# Altium PCB iMX6 Rex Development Baseboard V1I1_PCB.PcbDoc (part 4 of 6)
Units mm, origin at the board's own origin, x right, y up, seen from the top; angles counter-clockwise.
Board outline 135 x 110 mm, 6 copper layers (L1, L2, L3, L4 (PWR), L5, L6), stack 1.542 mm thick; 580 components, 458 nets, 2100 pads, 1201 vias.
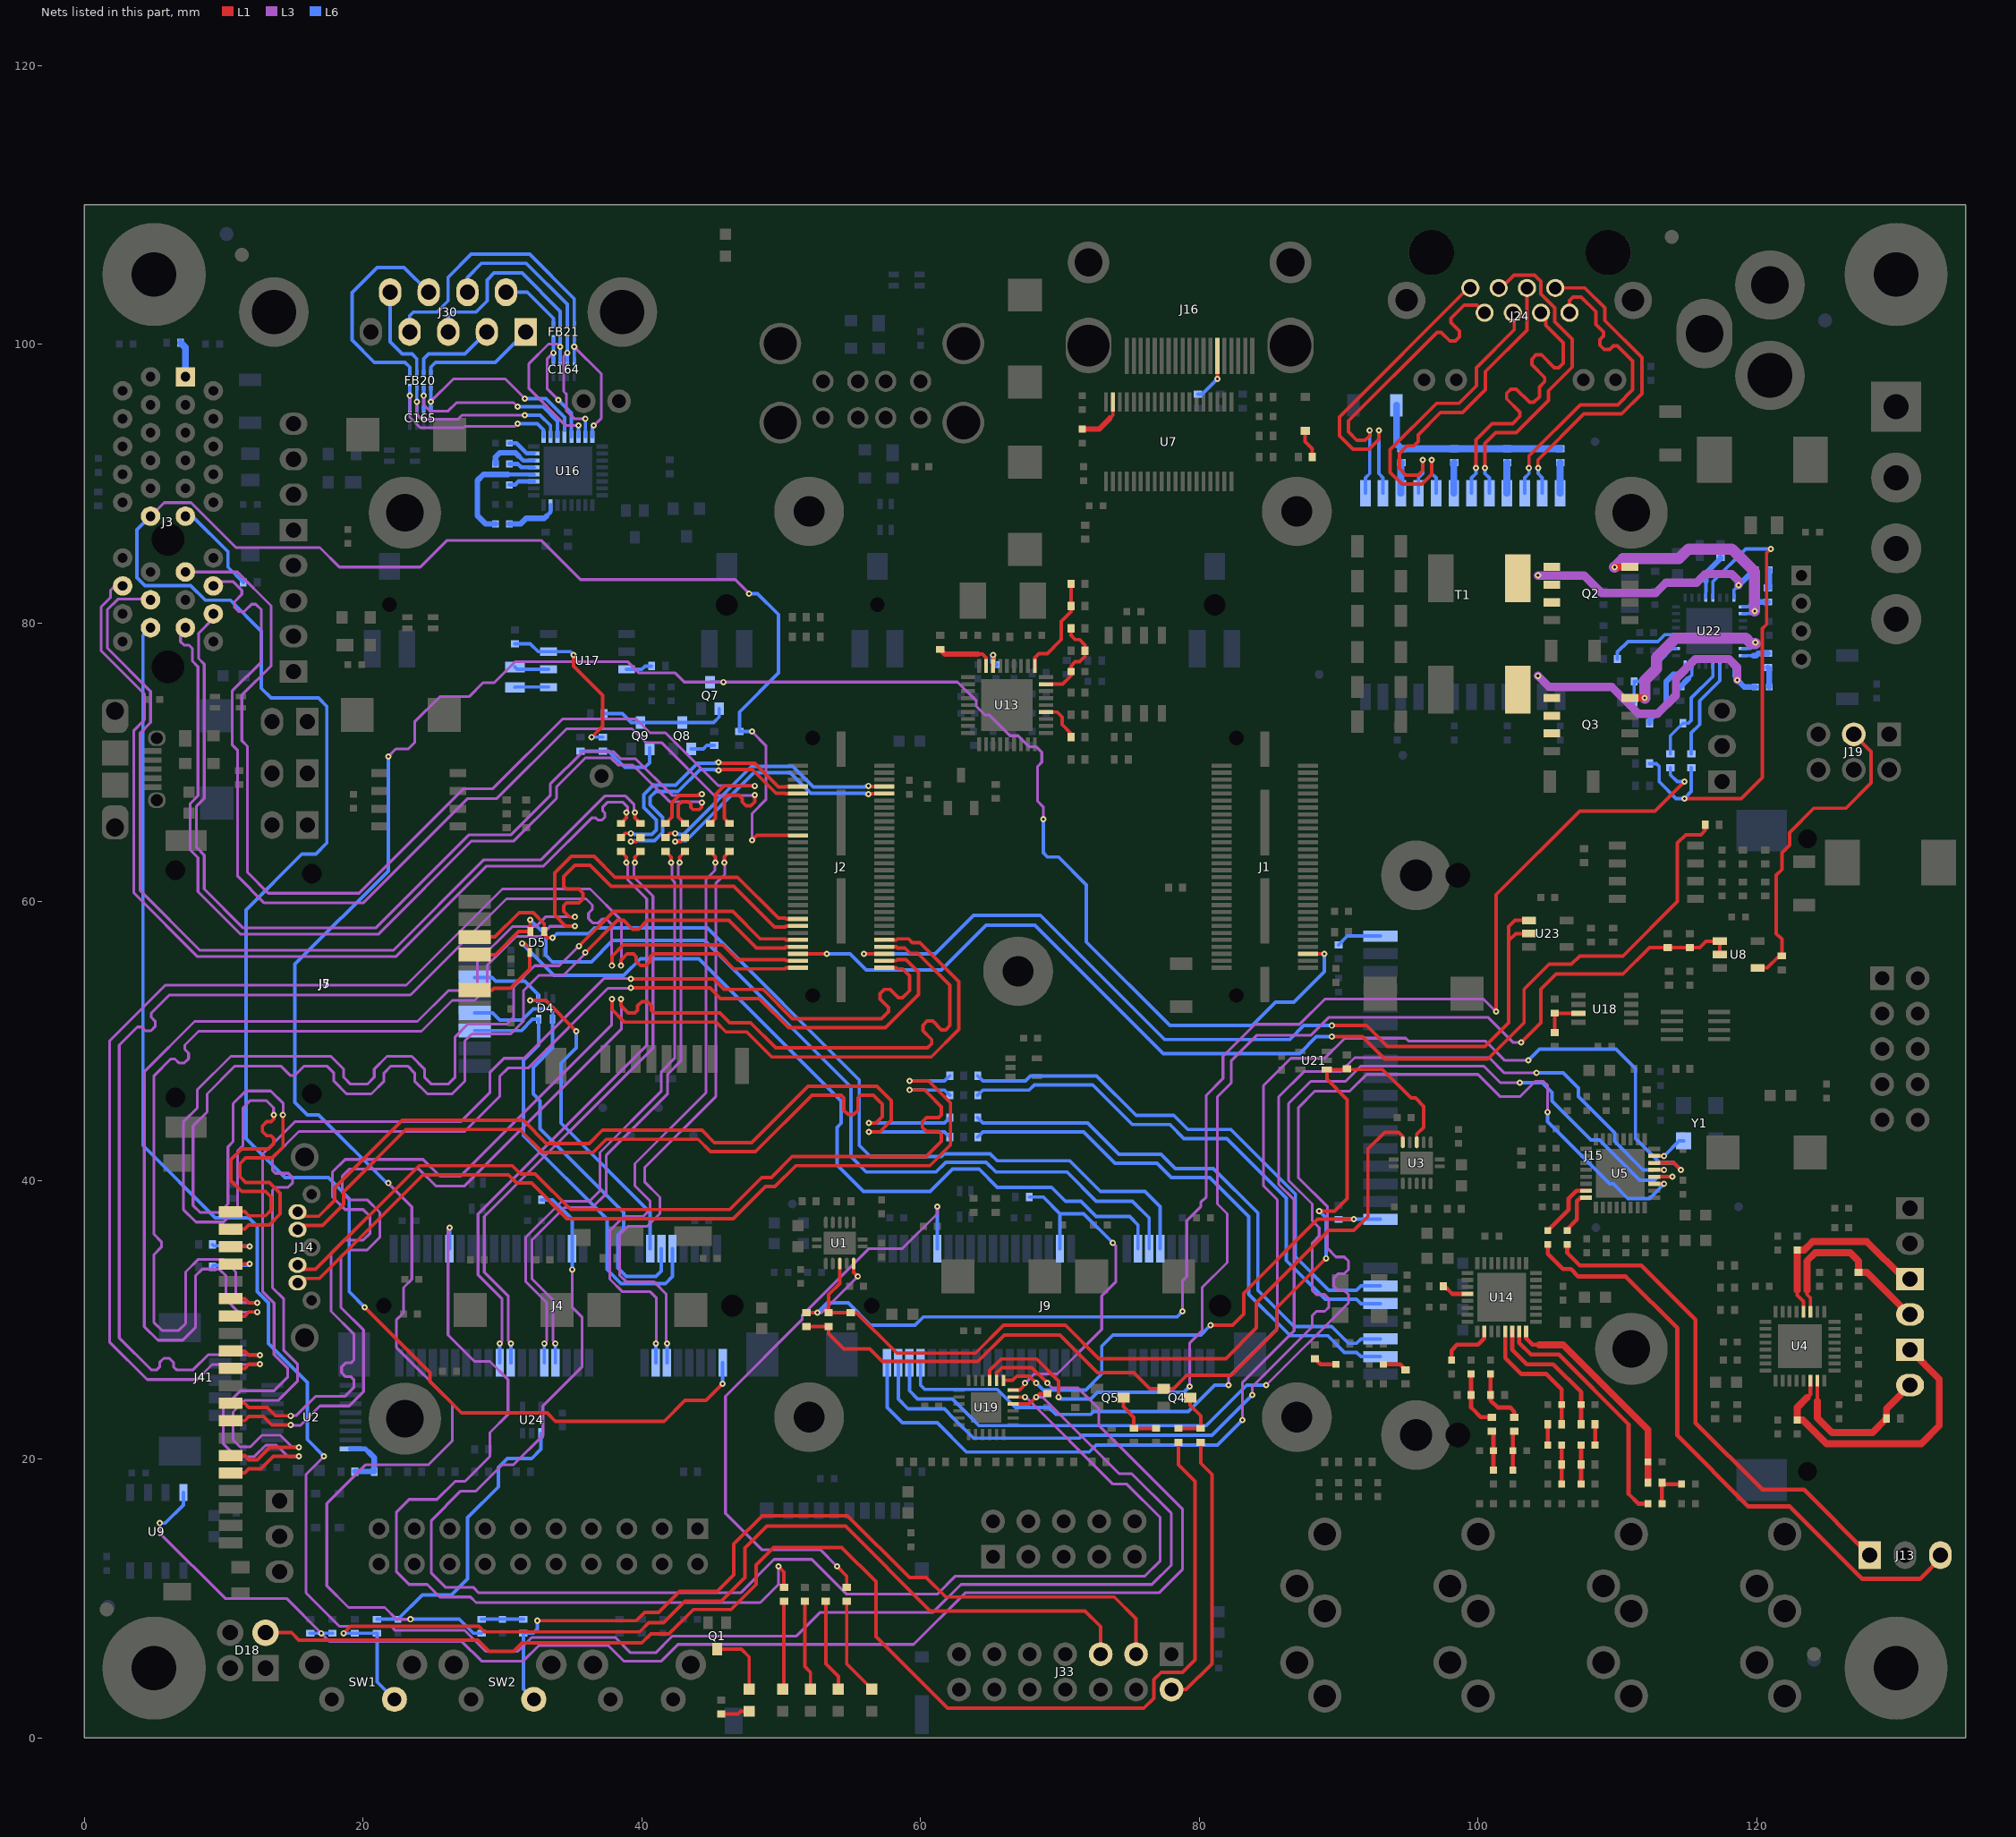
[diagram p8: the nets of this part, all layers, seen from the top]

## Via types
v1: diameter 0.45, hole 0.2, L1 to L6, tented both sides, 1092 vias
v2: diameter 1, hole 0.5, L1 to L6, tented both sides, 109 vias

## Nets (pads, with @x,y where several pads share a name; then routed paths per layer and width w, separated by ;. In a path a pad name is that pad's centre, name@x,y a point inside that pad or via, vN(x,y) a via of type N, cw(c..) or ccw(c..) an arc to the next point about the centre after c; other vN are vias at no path point) (continued)
LED_MPCIE1_WWAN: J4.42 R19.1 | length 65.4
  L1 w0.25: v1(49.8,12.3) 50.2,11.9 R19.1@50.2,10.8
  L3 w0.2: v1(26.2,36.6) 26.1,36.5 26.1,28.9 28,27 29.1,27 30.4,25.7 30.4,23.2 29.1,21.9 29.1,20.193 27.307,18.4 26.6,18.4 25.3,17.1 23.3,17.1 22.4,16.2 22.4,11.9 23.3,11 24.6,11 25.5,10.1 27.7,10.1 28.1,9.7 48.5,9.7 49.8,11 v1(49.8,12.3)
  L6 w0.25: J4.42@26.2,35.1 v1(26.2,36.6)
LED_MPCIE2_WWAN: J9.42 R25.1 | length 44.1
  L1 w0.25: v1(54,12.3) 54.7,11.6 R25.1@54.7,10.8
  L3 w0.2: v1(54,12.3) 52.8,13.5 48.6,13.5 46,16.1 46,24.5 51.5,30 51.5,30.3 56.3,35.1 58.7,35.1 61.2,37.6 v1(61.2,38.1)
  L6 w0.25: J9.42@61.2,35.1 v1(61.2,38.1)
LGATE1_5V: Q2.4 U22.18 | length 16.1
  L1 w0.5: v1(109.8,84) Q2.4@110.895,84
  L3 w0.8: v1(109.8,84) 110.4,84.6 114.4,84.6 115.1,85.3 118.2,85.3 119.85,83.65 v1(119.85,80.85)
  L6 w0.23: U22.18@119,80.65 119.65,80.65 v1(119.85,80.85)
LGATE2_3V3: Q3.4 U22.23 | length 13.3
  L1 w0.5: Q3.4@110.9,74.605 v1@111.965,74.605
  L3 w0.8: v1(111.965,74.61) 111.965,75.869 112.8,76.704 112.8,77.5 114.2,78.9 119.204,78.9 119.579,78.525 v1@119.9,78.525
  L6 w0.23: U22.23@119,78.15 119.55,78.15 119.9,78.5 v1(119.9,78.6)
LINE_IN_C_L: C59.2 J13.3 | length 43.9
  L1 w0.3: C59.2@105,35.4 105,34.725 106.1,33.625 106.675,33.625 107.2,33.1 110.6,33.1 114.3,29.4 114.3,21.7 119.4,16.6 122.376,16.6 127.576,11.4 131.7,11.4 133.18,12.88 J13.3@133.18,13.1
LINE_IN_C_R: C60.2 J13.1 | length 35.6
  L1 w0.3: C60.2@106.4,35.4 106.4,34.8 107.3,33.9 111.7,33.9 115.6,30 115.6,22.6 120.4,17.8 123.4,17.8 J13.1@128.1,13.1
LINE_IN_L: C59.1 U5.15 | length 4.4
  L1 w0.3: C59.1@105,36.4 106.5,37.9 106.5,38.7 107.05,39.25 U5.15@107.75,39.25
LINE_IN_R: C60.1 U5.16 | length 3.1
  L1 w0.3: C60.1@106.4,36.4 106.4,36.5 107.1,37.2 107.1,38.5 107.35,38.75 U5.16@107.75,38.75
LINEIN_L: C133.1 R95.1 U14.14 | length 9.8
  L1 w0.3: U14.14@102.45,29.15 102.45,27.85 103.5,26.8 105.4,26.8 107.4,24.8 C133.1@107.4,23.9 R95.1@107.4,22.5
LINEIN_R: C132.1 R94.1 U14.13 | length 9.4
  L1 w0.3: U14.13@101.95,29.15 101.95,27.25 103.1,26.1 104.9,26.1 106,25 R94.1@106,22.5
"LOCAL_PWR / NON_REM0": R78.2 R82.2 U13.28 | length 7.3
  L1 w0.25: U13.28@68.2,76.9 68.2,77.493 68.4,77.693 68.4,77.7 68.5,77.8 69.1,77.8 70.1,78.8 70.1,80.107 70.8,80.807 R82.2@70.8,81.2 R78.2@70.8,82.8
LVDS0_CABC: J2.6 U23.1 U23.2 | length 64.5
  L1 w0.25: v1(55.93,56.25) J2.6@57.39,56.25 ; v1(89.5,51.1) 92,51.1 93.5,49.6 100.5,49.6 102.2,51.3 102.2,57.2 ; U23.2@103.65,57.7 102.7,57.7 102.2,57.2 ; U23.1@103.65,58.65 102.65,58.65 102.2,58.2 102.2,57.2
  L6 w0.25: v1(55.93,56.25) 61.05,56.25 63.8,59 68.6,59 77.5,50.1 86.5,50.1 87.5,51.1 v1(89.5,51.1)
LVDS0_CLK_N: J2.13 J41.14 | length 96.5
  L1 w0.25: J41.14@10.5,30.25 11.5,30.25 11.8,30.55 v1(12.4,30.55) ; v1(35.2,58.9) 34.8,58.9 34.4,59.3 34.4,59.7 34.6,59.9 35.475,59.9 35.775,60.2 35.775,60.6 35.475,60.9 34.6,60.9 34.4,61.1 34.4,61.8 35.2,62.6 36.3,62.6 37.8,61.1 46.6,61.1 49.525,58.175 50.275,58.175 50.35,58.25 J2.13@51.21,58.25
  L3 w0.2: v1(12.4,30.55) 12.375,30.525 11.075,30.525 10.165,31.435 10.165,33.135 9.665,33.635 8.465,33.635 7.965,33.135 7.965,29.435 7.055,28.525 5.275,28.525 4.3,29.5 4.3,47.79 7.91,51.4 23.9,51.4 26.11,53.61 27.72,53.61 28.2,54.09 28.2,55.7 30.7,58.2 32.4,58.2 33.125,58.925 35.175,58.925 v1(35.2,58.9)
LVDS0_CLK_P: J2.15 J41.15 | length 96.5
  L1 w0.25: J41.15@10.5,31.5 11.5,31.5 11.8,31.2 v1(12.4,31.2) ; v1(35.2,58.25) 34.531,58.25 33.75,59.031 33.75,62.069 34.931,63.25 36.569,63.25 38.069,61.75 46.869,61.75 49.794,58.825 50.275,58.825 50.35,58.75 J2.15@51.21,58.75
  L3 w0.2: v1(12.4,31.2) 12.375,31.225 11.365,31.225 ; v1(35.2,58.25) 35.175,58.225 33.415,58.225 32.69,57.5 30.99,57.5 28.9,55.41 28.9,53.8 28.01,52.91 26.4,52.91 24.19,50.7 8.2,50.7 7.2,49.7 7.2,49.4 7.475,49.125 7.475,48.725 7.175,48.425 6.775,48.425 6.5,48.7 6.2,48.7 5,47.5 5,36.125 5.525,35.6 5.525,35.2 5,34.675 5,29.79 5.565,29.225 6.765,29.225 7.265,29.725 7.265,33.425 8.175,34.335 9.955,34.335 10.865,33.425 10.865,31.725 ; 10.865,31.725 11.365,31.225 ; 10.865,31.725 11.365,31.225
LVDS0_DPS: J41.18 R52.1 R54.2 | length 4.1
  L1 w0.25: J41.18@10.5,35.25 v1(11.85,35.25)
  L6 w0.25: R52.1@9.2,35.4 9.3,35.3 R54.2@10.7,35.3 11.8,35.3 v1(11.85,35.25)
LVDS0_FRC: J41.17 R53.1 R55.2 | length 4.1
  L1 w0.25: J41.17@10.5,34 v1(11.85,34)
  L6 w0.25: R53.1@9.2,33.8 9.3,33.9 R55.2@10.7,33.9 11.75,33.9 v1(11.85,34)
LVDS0_PWM: J2.5 R58.2 | length 82.9
  L1 w0.25: J2.5@51.21,56.25 v1(53.27,56.25) ; v1(89.5,50.3) 91.7,50.3 93.3,48.7 100.7,48.7 103.3,51.3 103.3,53.7 105.1,55.5 106.7,55.5 107.3,56.1 110.4,56.1 114.3,60 114.3,64.2 114.9,64.8 116,64.8 116.3,65.1 R58.2@116.3,65.5
  L6 w0.25: v1(53.27,56.25) 54.95,56.25 56.1,55.1 61.5,55.1 64.7,58.3 68.2,58.3 77.4,49.1 87.2,49.1 88.4,50.3 v1(89.5,50.3)
LVDS0_TX0_N: J2.2 J41.5 | length 96.5
  L1 w0.25: J41.5@10.5,19 11.5,19 11.8,19.3 12.669,19.3 13.569,20.2 v1(15.4,20.2) ; v1(39.2,54.45) 45.15,54.45 45.9,53.7 48.7,53.7 50.8,51.6 57.2,51.6 57.7,52.1 57.7,52.4 57.1,53 57.1,53.4 57.4,53.7 57.8,53.7 58.4,53.1 58.7,53.1 59.2,53.6 59.2,54.665 58.69,55.175 58.325,55.175 58.25,55.25 J2.2@57.39,55.25
  L3 w0.2: v1(15.4,20.2) 15.375,20.175 14.61,20.175 13.785,21 13.015,21 12.19,20.175 10.885,20.175 9.975,21.085 9.975,23.665 11.21,24.9 13.61,24.9 14.6,25.89 14.6,26.51 13.61,27.5 13.61,31.19 12.8,32 12.8,41.9 15.1,44.2 27,44.2 29.105,46.305 29.105,47.75 30.11,48.755 31.555,48.755 37.275,54.475 39.175,54.475 v1(39.2,54.45)
LVDS0_TX0_P: J2.4 J41.6 | length 96.5
  L1 w0.25: J41.6@10.5,20.25 11.5,20.25 11.8,19.95 12.4,19.95 13.3,20.85 v1(15.4,20.85) ; v1(39.2,53.8) 44.881,53.8 45.631,53.05 48.431,53.05 50.531,50.95 57.469,50.95 59.85,53.331 59.85,54.934 58.959,55.825 58.325,55.825 58.25,55.75 J2.4@57.39,55.75
  L3 w0.2: v1(15.4,20.85) 15.375,20.875 14.9,20.875 14.075,21.7 12.725,21.7 11.9,20.875 11.175,20.875 10.675,21.375 10.675,23.375 11.5,24.2 13.9,24.2 15.3,25.6 15.3,26.8 14.31,27.79 14.31,31.48 13.5,32.29 13.5,39.3 13.7,39.5 14.625,39.5 14.93,39.805 14.93,40.205 14.635,40.5 13.71,40.5 13.505,40.705 13.505,41.615 15.39,43.5 27.29,43.5 29.805,46.015 29.805,47.46 30.4,48.055 31.845,48.055 37.565,53.775 39.175,53.775 v1(39.2,53.8)
LVDS0_TX1_N: J2.8 J41.8 | length 96.4
  L1 w0.25: J41.8@10.5,22.75 11.5,22.75 11.8,23.05 12.85,23.05 13.45,22.45 v1(14.8,22.45) ; v1(38.5,53) 38.5,52.519 39.019,52 39.5,52 39.7,52.2 39.7,52.525 40,52.825 40.4,52.825 40.7,52.525 40.7,52.2 40.9,52 45.6,52 46.3,51.3 47.8,51.3 49.6,49.5 60.5,49.5 60.8,49.8 60.8,50.1 60.175,50.725 60.175,51.125 60.475,51.425 60.875,51.425 61.5,50.8 61.8,50.8 62.1,51.1 62.1,54 59.8,56.3 59.25,56.3 58.875,56.675 58.325,56.675 58.25,56.75 J2.8@57.39,56.75
  L3 w0.2: v1(14.8,22.45) 14.825,22.425 15.515,22.425 16.9,23.81 19.01,23.81 20.03,24.83 20.03,29.26 18.4,30.89 18.4,34.5 18.9,35 20.29,35 21.2,35.91 21.2,37.69 20.29,38.6 19,38.6 18.5,39.1 18.5,40.3 19,40.8 24.01,40.8 25.21,39.6 27.29,39.6 38.525,50.835 38.525,52.975 v1(38.5,53)
LVDS0_TX1_P: J2.10 J41.9 | length 96.4
  L1 w0.25: J41.9@10.5,24 11.5,24 11.8,23.7 13.119,23.7 13.719,23.1 v1(14.8,23.1) ; v1(37.85,53) 37.85,52.25 38.75,51.35 45.331,51.35 46.031,50.65 47.531,50.65 49.331,48.85 60.769,48.85 62.75,50.831 62.75,54.269 59.957,57.063 59.407,57.063 59.144,57.325 58.325,57.325 58.25,57.25 J2.10@57.39,57.25
  L3 w0.2: v1(14.8,23.1) 14.825,23.125 15.225,23.125 16.61,24.51 18.72,24.51 19.33,25.12 19.33,25.7 19.13,25.9 18.755,25.9 18.455,26.2 18.455,26.6 18.755,26.9 19.13,26.9 19.33,27.1 19.33,28.97 17.7,30.6 17.7,34.79 18.61,35.7 20,35.7 20.5,36.2 20.5,37.4 20,37.9 18.71,37.9 17.8,38.81 17.8,40.59 18.71,41.5 24.3,41.5 25.5,40.3 27,40.3 37.825,51.125 37.825,52.975 v1(37.85,53)
LVDS0_TX2_N: J2.1 J41.11 | length 96.5
  L1 w0.25: J41.11@10.5,26.5 11.5,26.5 11.8,26.8 v1(12.6,26.8) ; v1(38.5,55.4) 38.5,55.8 38.94,56.24 39.4,56.24 39.6,56.04 39.6,55.715 39.9,55.415 40.3,55.415 40.6,55.715 40.6,56.04 40.8,56.24 45.54,56.24 46.606,55.175 50.275,55.175 50.35,55.25 J2.1@51.21,55.25
  L3 w0.2: v1(12.6,26.8) 12.575,26.775 9.165,26.775 8.09,25.7 4.51,25.7 1.8,28.41 1.8,49.99 5.81,54 23.1,54 30,60.9 36.29,60.9 38.525,58.665 38.525,55.425 v1(38.5,55.4)
LVDS0_TX2_P: J2.3 J41.12 | length 96.4
  L1 w0.25: J41.12@10.5,27.75 11.5,27.75 11.8,27.45 v1(12.6,27.45) ; v1(37.85,55.4) 37.85,56.069 38.671,56.89 45.81,56.89 46.875,55.825 50.275,55.825 50.35,55.75 J2.3@51.21,55.75
  L3 w0.2: v1(12.6,27.45) 12.575,27.475 8.875,27.475 7.8,26.4 6.6,26.4 6.4,26.6 6.4,26.925 6.1,27.225 5.7,27.225 5.4,26.925 5.4,26.6 5.2,26.4 4.8,26.4 2.5,28.7 2.5,49.7 3.8,51 4.1,51 4.375,50.725 4.775,50.725 5.075,51.025 5.075,51.425 4.8,51.7 4.8,52 6.1,53.3 23.39,53.3 30.29,60.2 36,60.2 36.45,59.75 36.45,59.45 36.175,59.175 36.175,58.775 36.475,58.475 36.875,58.475 37.15,58.75 37.45,58.75 37.825,58.375 37.825,55.425 v1(37.85,55.4)
LVDS0_TX3_N: J2.7 J41.19 | length 96.4
  L1 w0.25: J41.19@10.5,36.5 11.5,36.5 11.8,36.8 13.269,36.8 14.05,37.581 14.05,39.069 13.269,39.85 11.569,39.85 11.169,40.25 11.169,41.2 11.569,41.6 13.469,41.6 14.25,42.381 v1(14.25,44.7) ; v1(35.95,56.35) 38.25,58.65 38.7,58.65 39.325,58.025 39.775,58.025 40.4,58.65 46.25,58.65 48.225,56.675 50.275,56.675 50.35,56.75 J2.7@51.21,56.75
  L3 w0.2: v1(14.25,44.7) 14.275,44.725 14.275,45.5 13.365,46.41 11.585,46.41 10.675,45.5 10.675,42.775 10.3,42.4 10.3,38.3 9.7,37.7 8.3,37.7 7.8,38.2 7.8,43.9 8.805,44.905 8.805,46.205 10.8,48.2 14.1,48.2 14.775,47.525 15.1,47.525 15.775,48.2 17.4,48.2 17.9,47.7 17.9,47.11 18.81,46.2 20.59,46.2 21.5,47.11 21.5,47.7 22,48.2 23.2,48.2 23.7,47.7 23.7,47.11 24.61,46.2 26.39,46.2 27.3,47.11 27.3,50 27.805,50.505 30.595,50.505 31.51,51.42 31.51,53.61 32.6,54.7 34.365,54.7 35.95,56.285 v1(35.95,56.35)
LVDS0_TX3_P: J2.9 J41.20 | length 96.4
  L1 w0.25: J41.20@10.5,37.75 11.5,37.75 11.8,37.45 13,37.45 13.4,37.85 13.4,38.8 13,39.2 11.3,39.2 10.519,39.981 10.519,41.469 11.3,42.25 13.2,42.25 13.6,42.65 13.6,43 13.4,43.2 13.075,43.2 12.775,43.5 12.775,43.9 13.075,44.2 13.4,44.2 13.6,44.4 v1(13.6,44.7) ; v1(35.49,56.81) 37.981,59.3 46.519,59.3 48.494,57.325 50.275,57.325 50.35,57.25 J2.9@51.21,57.25
  L3 w0.2: 13.575,45.2 13.575,44.725 v1(13.6,44.7) ; 13.575,45.21 13.075,45.71 11.875,45.71 11.375,45.21 11.375,42.485 11,42.11 11,38.01 9.99,37 8.01,37 7.1,37.91 7.1,44.19 8.105,45.195 8.105,46.495 10.51,48.9 17.69,48.9 18.6,47.99 18.6,47.4 19.1,46.9 20.3,46.9 20.8,47.4 20.8,47.99 21.71,48.9 23.49,48.9 24.4,47.99 24.4,47.4 24.9,46.9 26.1,46.9 26.6,47.4 26.6,50.29 27.515,51.205 30.305,51.205 30.81,51.71 30.81,53.9 32.31,55.4 34.075,55.4 v1@35.488,56.812
LVDS_BLON: R165.1 R166.2 U8.1 U8.2 U19.15 | length 85.3
  L1 w0.24: U19.15@64.95,25.65 64.95,26.2
  L1 w0.25: 64.95,26.2 64.95,26.35 65.783,27.183 68.317,27.183 69.9,25.6 v1(69.9,24.45) ; v1(103.1,49.9) 104.5,51.3 104.5,53.7 105.6,54.8 110.4,54.8 112.3,56.7 R165.1@115.2,56.7 115.9,56.7 116.35,57.15 U8.1@117.35,57.15 U8.2@117.35,56.2
  L3 w0.2: v1(79.3,25.2) 79.3,28.3 80.2,29.2 80.2,32.3 82,34.1 82,37.6 81.3,38.3 81.3,46 82.3,47 82.3,48.6 84.1,50.4 88,50.4 89.3,51.7 100.7,51.7 102.5,49.9 v1(103.1,49.9)
  L6 w0.25: v1(69.9,24.45) 70.05,24.3 72.2,24.3 72.7,24.8 78.9,24.8 v1(79.3,25.2)
LVDS_EN: R167.1 R168.2 U9.4 U19.14 | length 109.6
  L1 w0.24: U19.14@65.45,25.65 65.45,26.175
  L1 w0.25: 65.45,26.175 65.842,26.567 67.983,26.567 v1(69.1,25.45)
  L3 w0.2: v1(5.4,15.4) 5.4,14.7 10.1,10 14.5,10 v1(17,7.5) 17.6,6.9 27.1,6.9 28.5,5.5 31.5,5.5 32.62,6.62 37.58,6.62 38.7,5.5 41.4,5.5 42.6,6.7 59.5,6.7 63.2,10.4 77.1,10.4 78.8,12.1 78.8,16.4 72.8,22.4 72.8,23.6 71.3,25.1 69.45,25.1 v1(69.1,25.45)
  L6 w0.25: v1(5.4,15.4) 5.8,15.4 7.105,16.705 U9.4@7.105,17.6 ; R168.2@16.2,7.5 v1(17,7.5) R167.1@17.8,7.5
MCT0: R87.1 T1.15 | length 2.2
  L6 w0.5: T1.15@94.455,89.302 94.455,91.455 R87.1@94.5,91.5
MCT1: R85.1 T1.21 | length 2.2
  L6 w0.5: T1.21@102.075,89.302 102.075,91.475 R85.1@102.1,91.5
MCT2: R86.1 T1.18 | length 2.2
  L6 w0.5: T1.18@98.265,89.302 98.265,91.465 R86.1@98.3,91.5
MCT3: R84.1 T1.24 | length 2.2
  L6 w0.5: T1.24@105.885,89.302 105.885,91.485 R84.1@105.9,91.5
MCT_CHASSIS: C119.1 R84.2 R85.2 R86.2 R87.2 | length 14.6
  L6 w0.5: C119.1@94.15,95.6 94.15,92.85 R87.2@94.5,92.5 R86.2@98.3,92.5 R85.2@102.1,92.5 R84.2@105.9,92.5
MIC_BIAS: C147.1 R102.2 U14.16 | length 15.8
  L1 w0.3: U14.16@103.45,29.15 103.45,28.65 103.9,28.2 104.4,28.2
  L1 w0.5: 104.4,28.2 106.1,28.2 112.2,22.1 C147.1@112.2,19.8 R102.2@112.2,18.3
MIC_IN: C148.1 U14.15 | length 17.8
  L1 w0.3: U14.15@102.95,29.15 102.95,28.35 103.8,27.5 105.8,27.5 110.8,22.5 110.8,17.5 111.5,16.8 C148.1@112.2,16.8
MODEM_LOUT+: C210.2 J10.1 U4.6 | length 21
  L1 w0.28: 123.6,24.4 123.85,24.65 U4.6@123.85,25.625
  L1 w0.5: 123.6,24.4 122.9,23.7 C210.2@122.9,22.8 123.3,22.8 125,21.1 131.8,21.1 133.1,22.4 133.1,25.74 J10.1@131,27.84
MODEM_LOUT-: J10.2 R156.2 U4.7 | length 11.6
  L1 w0.28: 124.35,24.15 U4.7@124.35,25.625
  L1 w0.5: 124.35,24.15 124.35,22.95 125.4,21.9 128.3,21.9 R156.2@129.3,22.9 129.3,23.6 J10.2@131,25.3
MODEM_ROUT+: C212.2 J12.1 U4.20 | length 14
  L1 w0.25: 122.9,32 122.9,31.75 123.35,31.3 U4.20@123.35,30.575
  L1 w0.5: 122.9,32.1 C212.2@122.9,35 123.4,35 124,35.6 127.9,35.6 130.58,32.92 J12.1@131,32.92
MODEM_ROUT-: J12.2 R155.2 U4.19 | length 13.7
  L1 w0.25: 123.6,32.1 123.6,31.8 123.85,31.55 U4.19@123.85,30.575
  L1 w0.5: 123.6,32.1 123.6,34.2 124.2,34.8 126.7,34.8 127.3,34.2 R155.2@127.3,33.4 127.9,33.4 130.92,30.38 J12.2@131,30.38
MPCIE1_CLK1_N: J4.11 R2.2 | length 44.3
  L1 w0.25: v1(45.925,62.8) 45.925,63.225 R2.2@46.3,63.6
  L3 w0.2: v1(41.8,28.3) 41.75,28.35 41.75,31.84 40.89,32.7 38.9,32.7 38.4,33.2 38.4,36.1 39,36.7 40.39,36.7 41.3,37.61 41.3,38.79 40.2,39.89 40.2,40.9 45.3,46 45.3,61.3 45.95,61.95 45.95,62.775 v1(45.925,62.8)
  L6 w0.25: J4.11@41.8,26.9 v1(41.8,28.3)
MPCIE1_CLK1_P: J4.13 R4.2 | length 44.3
  L1 w0.25: R4.2@44.9,63.6 45.275,63.225 v1(45.275,62.8)
  L3 w0.2: v1(41,28.3) 41.05,28.35 41.05,31.55 40.6,32 38.61,32 37.7,32.91 37.7,36.39 38.71,37.4 40.1,37.4 40.6,37.9 40.6,38.5 39.5,39.6 39.5,41.19 44.6,46.29 44.6,61.59 45.25,62.24 45.25,62.775 v1(45.275,62.8)
  L6 w0.25: J4.13@41,26.9 v1(41,28.3)
MPCIE1_RX_N: J4.23 R7.2 | length 43.3
  L1 w0.25: v1(42.7,62.8) 42.7,63.2 R7.2@43.1,63.6
  L3 w0.2: v1(33.8,28.3) 33.625,28.475 33.625,31.411 32.118,32.918 32.118,35.718 34.45,38.05 36.436,38.05 37.45,39.064 37.45,41.814 41.85,46.214 41.85,47.614 42.8,48.564 42.8,61.586 42.625,61.761 42.625,62.725 v1(42.7,62.8)
  L6 w0.25: J4.23@33.8,26.9 v1(33.8,28.3)
MPCIE1_RX_P: J4.25 R9.2 | length 43.3
  L1 w0.25: R9.2@41.7,63.6 42.1,63.2 v1(42.1,62.8)
  L3 w0.2: v1(33,28.3) 33.175,28.475 33.175,31.225 31.668,32.732 31.668,35.905 34.264,38.5 36.25,38.5 37,39.25 37,42 41.4,46.4 41.4,47.8 42.35,48.75 42.35,61.4 42.175,61.575 42.175,62.725 v1(42.1,62.8)
  L6 w0.25: J4.25@33,26.9 v1(33,28.3)
MPCIE1_SIM_CLK: D4.4 J4.12 J5.C3 | length 33.2
  L6 w0.25: J5.C3@28,52.01 29.29,52.01 29.8,51.5 31.4,51.5 32.2,52.3 33.4,52.3 33.6,52.1 D4.4@33.6,51.55 33.6,49.5 32.2,48.1 32.2,46.2 32.7,45.7 32.7,43.7 38.7,37.7 38.7,36.5 38.275,36.075 38.275,33.725 38.9,33.1 41,33.1 41.4,33.5 J4.12@41.4,35.1
MPCIE1_SIM_DATA: D4.5 J4.10 J5.C7 | length 33.1
  L6 w0.25: J5.C7@28,50.74 31.34,50.74 32.15,51.55 D4.5@32.6,51.55 32.6,49.7 31.5,48.6 31.5,43.2 37.5,37.2 37.5,33.6 38.5,32.6 41.7,32.6 42.2,33.1 J4.10@42.2,35.1
MPCIE1_SIM_RST: D4.1 J4.14 J5.C2 | length 29.3
  L1 w0.25: v1(32,52.9) 33.1,52.9 v1(35.3,50.7)
  L6 w0.25: J5.C2@28,54.55 29.263,54.55 29.513,54.3 31.593,54.3 32.562,53.331 D4.1@32.562,53.05 D4.1@32.412,52.9 ; v1(35.3,50.7) 35.3,49.5 34.2,48.4 34.2,44.1 40.6,37.7 J4.14@40.6,35.1 ; D4.1@32.412,52.9 v1(32,52.9) D4.1@32.412,52.9
MPCIE1_TX_N: J4.31 R12.2 | length 43.2
  L1 w0.25: v1(39.5,62.8) 39.5,63.2 R12.2@39.9,63.6
  L3 w0.2: v1(30.6,28.3) 30.425,28.475 30.425,31.675 28.7,33.4 28.7,37.4 40.8,49.5 40.8,60.386 39.45,61.736 ; 39.425,61.761 39.425,62.725 v1(39.5,62.8)
  L6 w0.25: J4.31@30.6,26.9 v1(30.6,28.3)
MPCIE1_TX_P: J4.33 R16.2 | length 43.2
  L1 w0.25: R16.2@38.5,63.6 38.9,63.2 v1(38.9,62.8)
  L3 w0.2: v1(29.8,28.3) 29.975,28.475 29.975,31.489 28.25,33.214 28.25,37.586 40.35,49.686 40.35,60.2 39,61.55 ; v1(38.9,62.8) 38.975,62.725 38.975,61.575
  L6 w0.25: J4.33@29.8,26.9 v1(29.8,28.3)
MPCIE1_WDISN: J4.20 R73.1 U19.11 | length 107.2
  L1 w0.24: U19.11@66.65,24.45 67.2,24.45
  L1 w0.25: 67.2,24.45 v1(67.5,24.45)
  L3 w0.2: v1(35,33.6) 35,30.9 35.7,30.2 35.7,26.6 32.9,23.8 32.9,21.7 30.8,19.6 30,19.6 28.1,17.7 27,17.7 24.9,15.6 24.9,11.8 25.9,10.8 27.9,10.8 28.3,10.4 47.081,10.4 49.481,12.8 52.2,12.8 54.7,10.3 61.2,10.3 62.5,11.6 76.1,11.6 77.2,12.7 77.2,15.8 74.8,18.2 73.807,18.2 67.557,24.45 v1(67.5,24.45)
  L6 w0.25: R73.1@32.8,38.6 33.6,38.6 35,37.2 J4.20@35,35.1 35,33.7 v1(35,33.6)
MPCIE2_12M_CLK: U5.31 Y1.3 | length 2.5
  L1 w0.25: U5.31@112.65,41.75 v1(113.35,41.75)
  L6 w0.25: v1(113.35,41.75) 114.43,42.83 Y1.3@114.75,42.83
MPCIE2_PCM_CLK: J9.45 U5.30 | length 89.8
  L1 w0.25: U5.30@112.65,41.25 114.05,41.25 v1(114.55,40.75)
  L3 w0.2: v1(82.1,25.3) 82.1,25.9 82.3,26.1 82.307,26.1 85.6,29.393 85.6,38.6 84.6,39.6 84.6,46.793 86.557,48.75 88.993,48.75 90.443,50.2 94.8,50.2 95,50 100.527,50 101.927,48.6 v1(103.6,48.6)
  L6 w0.25: J9.45@60,26.9 60,25.3 60.3,25 65.5,25 66.8,23.7 69.2,23.7 69.7,23.2 72.2,23.2 72.4,23.4 79.2,23.4 81.1,25.3 v1(82.1,25.3) ; v1(103.6,48.6) 104.4,49.4 109.9,49.4 111.3,48 111.3,43 113.05,41.25 114.05,41.25 v1(114.55,40.75)
MPCIE2_PCM_RX: J9.47 U5.27 | length 89.7
  L1 w0.25: U5.27@112.65,39.75 v1(113.35,39.75)
  L3 w0.2: v1(84.8,25.3) 90.7,31.2 90.7,31.8 90.4,32.1 89.95,32.1 89.65,32.4 89.65,33 89.95,33.3 90.4,33.3 90.7,33.6 90.7,34.2 90.4,34.5 89.8,34.5 89.2,35.1 89.2,38.1 87.1,40.2 87.1,45.2 88.3,46.4 90.8,46.4 92,47.6 100,47.6 101.6,46 103,46 104.1,47.1 104.7,47.1 105,46.8 v1(105,44.9)
  L6 w0.25: J9.47@59.2,26.9 59.2,24.9 59.8,24.3 62.3,24.3 63.6,23 63.6,22.993 64.193,22.4 73.266,22.4 80.5,22.4 83.4,25.3 v1@84.6,25.3 ; v1(105,44.9) 105,44.2 109.45,39.75 109.7,39.75 110.75,38.7 112.3,38.7 v1(113.35,39.75)
MPCIE2_PCM_SYNC: J9.51 U5.29 | length 89.7
  L1 w0.25: U5.29@112.65,40.75 v1(113.35,40.75)
  L3 w0.2: v1(83.1,22.8) 83.1,25.5 86.8,29.2 86.8,38.6 85.693,39.707 85.693,45.993 87.5,47.8 90.15,47.8 91.15,48.8 100.8,48.8 101.9,47.7 v1(104.2,47.7)
  L6 w0.25: J9.51@57.6,26.9 57.6,23.7 58.7,22.6 61.2,22.6 63.3,20.5 72.1,20.5 72.6,21 81.3,21 v1(83.1,22.8) ; v1(104.2,47.7) 106.107,47.7 107.2,46.607 107.2,46 109.8,43.4 109.8,42.793 111.843,40.75 v1(113.35,40.75)
MPCIE2_PCM_TX: J9.49 U5.28 | length 89.8
  L1 w0.25: U5.28@112.65,40.25 v1(113.95,40.25)
  L3 w0.2: v1(83.8,24.6) 83.8,25.2 88.1,29.5 88.1,30.3 88.4,30.6 89,30.6 89.3,30.9 89.3,31.5 89,31.8 88.4,31.8 88.1,32.1 88.1,35.5 88.6,36 88.6,36.6 88.1,37.1 88.1,38.3 86.4,40 86.4,45.5 88,47.1 90.5,47.1 91.6,48.2 100.4,48.2 101.6,47 v1(103,47)
  L6 w0.25: J9.49@58.4,26.9 58.4,24.3 59.1,23.6 61.707,23.6 62.4,22.907 62.4,22.9 63.8,21.5 71.4,21.5 71.6,21.7 80.9,21.7 v1(83.8,24.6) ; v1(103,47) 104.6,47 105.3,46.3 105.3,45.7 108.1,42.9 108.7,42.9 111.6,40 112.65,40 112.9,40.25 v1(113.95,40.25)
MPCIE2_SIM_CLK: D5.5 J7.C3 J9.12 | length 66.6
  L1 w0.25: J7.C3@28,56.19 29.5,56.19 31.16,57.85 D5.5@32,57.85 v1(32,58.7)
  L6 w0.25: v1(32,58.7) 33.1,57.6 33.1,56.154 33.579,55.675 36.375,55.675 37.9,57.2 44.5,57.2 55,46.7 55,41.7 56.1,40.6 61.1,40.6 61.8,41.3 64.7,41.3 65.4,40.6 70.5,40.6 72.6,38.5 75.2,38.5 76.4,37.3 J9.12@76.4,35.1
MPCIE2_SIM_DATA: D5.4 J7.C7 J9.10 | length 65.7
  L1 w0.25: J7.C7@28,57.46 29.46,57.46 31.2,59.2 32.207,59.2 33,58.407 D5.4@33,57.85 33,57.6 33.2,57.4 v1(33.6,57.4)
  L6 w0.25: v1@33.6,57.3 v1@33.65,57.35 ; v1(33.6,57.4) 33.9,57.7 36.2,57.7 36.6,58.1 44.7,58.1 55.6,47.2 55.6,42.5 56.4,41.7 61.5,41.7 61.7,41.9 65,41.9 65.5,41.4 70.7,41.4 72.9,39.2 76.1,39.2 77.2,38.1 J9.10@77.2,35.1
MPCIE2_SIM_RST: D5.1 J7.C2 J9.14 | length 66.5
  L1 w0.25: J7.C2@28,53.65 29.25,53.65 29.38,53.78 30.58,53.78 31.962,55.162 31.962,56.638 31.6,57 v1(31.4,57)
  L6 w0.25: v1(31.4,57) 33.7,54.7 38.7,54.7 39.9,55.9 44.1,55.9 54.3,45.7 54.3,44.1 54,43.8 54,41.1 55.9,39.2 60.693,39.2 62.293,40.8 64.2,40.8 65.5,39.5 69.4,39.5 70.4,38.5 71.5,38.5 72.6,37.4 75,37.4 75.6,36.8 J9.14@75.6,35.1
MPCIE2_WDISN: J9.20 R150.1 U19.12 | length 24.8
  L1 w0.24: U19.12@66.65,24.95 67.1,24.95 67.5,25.35 v1(67.5,25.45)
  L3 w0.2: v1(67.5,25.45) 68.15,26.1 69.8,26.1 73,29.3 73,31.7 74,32.7 74,35.3 v1(73.8,35.5)
  L6 w0.25: R150.1@67.8,38.8 68.8,38.8 70,37.6 ; J9.20@70,35.1 70,37.6 ; v1(73.8,35.5) 73.8,35.507 71.707,37.6 70,37.6
MX0_N: J24.2 T1.13 | length 23.3
  L1 w0.25: v1(92.225,93.8) 92.225,93.425 92.207,93.407 91.9,93.1 91.3,93.1 90.7,93.7 90.7,94.5 97.05,100.85 97.35,100.85 97.975,100.225 98.375,100.225 98.675,100.525 98.675,100.925 98.05,101.55 98.05,101.85 99,102.8 99.92,102.8 J24.2@100.47,102.25
  L6 w0.25: T1.13@91.915,89.302 91.915,90.399 92.225,90.709 v1(92.225,93.8)
MX0_P: J24.1 T1.14 | length 23.3
  L1 w0.25: v1(92.875,93.8) 92.875,93.156 92.169,92.45 91.031,92.45 90.05,93.431 90.05,94.769 99.25,103.969 J24.1@99.45,103.969
  L6 w0.25: v1(92.875,93.8) 92.875,90.709 93.185,90.399 T1.14@93.185,89.302
MX1_N: J24.6 T1.19 | length 23.3
  L1 w0.25: v1(99.845,91.1) 99.845,93.145 101,94.3 102.481,94.3 103,94.819 103,95.119 102.05,96.069 102.05,96.469 102.35,96.769 102.75,96.769 103.7,95.819 104,95.819 104.4,96.219 104.4,96.919 104.781,97.3 104.781,97.6 103.856,98.525 103.856,98.925 104.156,99.225 104.556,99.225 105.481,98.3 105.781,98.3 106.1,98.619 106.1,100.1 104.85,101.35 104.85,101.92 J24.6@104.52,102.25
  L6 w0.25: T1.19@99.535,89.302 99.535,90.399 99.845,90.709 v1(99.845,91.1)
MX1_P: J24.3 T1.20 | length 23.3
  L1 w0.25: v1(100.495,91.1) 100.495,92.876 101.269,93.65 102.75,93.65 105.05,95.95 105.05,96.65 106.75,98.35 106.75,100.369 105.5,101.619 105.5,102.6 104.5,103.6 104.5,104.5 104.045,104.955 102.585,104.955 101.66,104.03 J24.3@101.48,104.03
  L6 w0.25: v1(100.495,91.1) 100.495,90.709 100.805,90.399 T1.20@100.805,89.302
MX2_N: J24.5 T1.16 | length 23.3
  L1 w0.25: v1(96.035,91.7) 96.035,90.935 95.7,90.6 94.819,90.6 94.35,91.069 94.35,92.15 94.9,92.7 95.4,92.7 95.7,93 95.7,93.5 97.3,95.1 98.9,95.1 100.531,96.731 100.531,98.031 103.51,101.01 J24.5@103.51,104.03
  L6 w0.25: T1.16@95.725,89.302 95.725,90.399 96.035,90.709 v1(96.035,91.7)
MX2_P: J24.4 T1.17 | length 23.3
  L1 w0.25: v1(96.685,91.7) 96.685,90.666 95.969,89.95 94.55,89.95 93.7,90.8 93.7,92.419 97.031,95.75 98.631,95.75 99.881,97 99.881,98.3 102.6,101.019 102.6,102.15 J24.4@102.5,102.25
  L6 w0.25: v1(96.685,91.7) 96.685,90.709 96.995,90.399 T1.17@96.995,89.302
MX3_N: J24.8 T1.22 | length 23.3
  L1 w0.25: v1(103.655,91.1) 103.655,91.974 107.331,95.65 110.031,95.65 111.1,96.719 111.1,98.774 110,99.874 109.7,99.874 109.45,99.624 109.05,99.624 108.75,99.924 108.75,100.324 109,100.574 109,100.874 108.45,101.424 108.45,102.331 107.401,103.38 106.83,103.38 106.56,103.11 J24.8@106.56,102.25
  L6 w0.25: T1.22@103.345,89.302 103.345,90.399 103.655,90.709 v1(103.655,91.1)
MX3_P: J24.7 T1.23 | length 23.3
  L1 w0.25: v1@104.3,91.105 104.3,91.7 107.6,95 110.3,95 111.75,96.45 111.75,99.043 109.1,101.693 109.1,102.6 107.67,104.03 J24.7@105.54,104.03
  L6 w0.25: v1(104.305,91.1) 104.305,90.709 104.615,90.399 T1.23@104.615,89.302
NetC73_1: C73.1 U7.37 | length 3.6
  L1 w0.25: 73.6,94.7 73.8,94.9 U7.37@73.8,95.85
  L1 w0.4: C73.1@71.6,93.9 72.8,93.9 73.6,94.7
NetC120_2: C120.2 R92.2 | length 1.7
  L1 w0.3: R92.2@88.3,27.2 88.7,26.8 C120.2@89.8,26.8
NetC121_2: C121.2 R93.2 | length 1.8
  L1 w0.3: C121.2@93.2,26.8 94.4,26.8 R93.2@94.8,26.4
NetC130_1: C130.1 R94.2 | length 1.5
  L1 w0.3: C130.1@105,21 R94.2@105,22.5
NetC130_2: C130.2 FB14.1 R96.2 | length 2.8
  L1 w0.3: FB14.1@106,18.2 C130.2@106,21
NetC131_1: C131.1 R95.2 | length 1.5
  L1 w0.3: C131.1@108.4,21 R95.2@108.4,22.5
NetC131_2: C131.2 FB15.1 R97.2 | length 2.8
  L1 w0.3: FB15.1@107.4,18.2 C131.2@107.4,21
NetC140_1: C140.1 U14.10 | length 3.9
  L1 w0.3: C140.1@98.1,27.1 98.1,27.8 98.5,28.2 100,28.2 100.45,28.65 U14.10@100.45,29.15
NetC141_2: C141.2 R98.1 R100.2 | length 4.2
  L1 w0.3: C141.2@99.5,26.1 R100.2@99.5,24.6 99.5,23.7 100.2,23 R98.1@101,23
NetC142_2: C142.2 R99.1 R101.2 | length 4.3
  L1 w0.3: C142.2@100.9,26.1 R101.2@100.9,24.6 100.9,24.2 101.4,23.7 102.3,23.7 102.6,23.4 R99.1@102.6,23
NetC143_2: C143.2 FB16.1 R98.2 | length 2.8
  L1 w0.3: R98.2@101,22 101.1,21.9 C143.2@101.1,20.6 FB16.1@101.1,19.2
NetC144_2: C144.2 FB17.1 R99.2 | length 2.8
  L1 w0.3: FB17.1@102.5,19.2 102.5,21.9 R99.2@102.6,22
NetC148_2: C148.2 FB18.1 R102.1 | length 2.9
  L1 w0.3: C148.2@113.2,16.8 R102.1@113.2,18.3 113.3,18.2 FB18.1@114.6,18.2
NetC159_1: C159.1 U16.27 | length 1.9
  L6 w0.3: C159.1@30.5,89.9 30.6,89.9 30.9,89.9 31.15,90.15 U16.27@32.25,90.15
NetC160_1: C160.1 U16.28 | length 8.3
  L6 w0.3: 30.4,90.65 U16.28@32.25,90.65
  L6 w0.4: C160.1@29.5,87.1 28.8,87.1 28.2,87.7 28.2,90.213 28.637,90.65 30.4,90.65
NetC160_2: C160.2 U16.23 | length 3.8
  L6 w0.3: 33.175,87.675 33.45,87.95 U16.23@33.45,88.45
  L6 w0.4: C160.2@30.5,87.1 31.3,87.1 31.7,87.5 33,87.5 33.175,87.675
NetC161_1: C161.1 U16.31 | length 2.1
  L6 w0.3: C161.1@30.5,92.9 31,92.9 31.75,92.15 U16.31@32.25,92.15
NetC162_1: C162.1 U16.29 | length 1.9
  L6 w0.3: C162.1@30.5,91.4 31.1,91.4 31.35,91.15 U16.29@32.25,91.15
NetC162_2: C162.2 U16.30 | length 3.6
  L6 w0.3: 31.136,92 31.486,91.65 U16.30@32.25,91.65
  L6 w0.4: C162.2@29.5,91.4 29.5,91.9 29.8,92.2 30.936,92.2 31.136,92
NetC186_2: C186.2 R127.1 | length 1.3
  L6 w0.4: R127.1@120.9,82.5 C186.2@120.9,83.8
NetC187_1: C187.1 R126.2 | length 1.4
  L6 w0.4: R126.2@120.8,76.8 120.9,76.7 C187.1@120.9,75.4
NetC199_1: C199.1 R142.1 R143.1 | length 3
  L6 w0.25: R143.1@28.5,8.5 C199.1@30,8.5 R142.1@31.5,8.5
NetD1_1: D1.1 R19.2 | length 6.3
  L1 w0.25: D1.1@50.1,3.5 50.2,3.6 R19.2@50.2,9.8
NetD2_1: D2.1 R21.2 | length 6.5
  L1 w0.25: R21.2@51.7,9.8 51.7,5.1 52.1,4.7 D2.1@52.1,3.5
NetD3_1: D3.1 R22.2 | length 6.7
  L1 w0.25: R22.2@53.2,9.8 53.2,5.3 54.1,4.4 D3.1@54.1,3.5
NetD6_1: D6.1 R25.2 | length 7
  L1 w0.25: R25.2@54.7,9.8 54.7,5.3 D6.1@56.5,3.5
NetD7_1: D7.1 R50.1 | length 2.1
  L1 w0.25: D7.1@87.6,93.781 87.6,93 88.1,92.5 R50.1@88.1,91.9
NetD14_1: D14.1 Q1.3 | length 4.8
  L1 w0.25: Q1.3@45.4,6.35 47.15,6.35 47.7,5.8 D14.1@47.7,3.5
NetD14_2: D14.2 R107.2 | length 2.2
  L1 w0.25: R107.2@45.7,1.7 46.9,1.7 47.1,1.9 D14.2@47.8,1.9
NetJ3_A1: J3.A1 R6.1 | length 2.6
  L6 w0.5: R6.1@6.9,100.1 7.25,99.75 J3.A1@7.25,97.65
NetJ16_14: J16.14 R162.1 | length 3.5
  L1 w0.25: v1(81.3,97.5) J16.14@81.3,99.14
  L6 w0.25: R162.1@79.9,96.4 80.2,96.4 v1(81.3,97.5)
NetQ4_3: Q4.3 R144.2 R145.2 | length 4.1
  L1 w0.25: R145.2@78.5,22.2 R144.2@80.1,22.2 80.1,23.1 79.35,23.85 Q4.3@79.35,24.4
NetQ5_3: Q5.3 R146.2 R148.2 | length 4.1
  L1 w0.25: Q5.3@74.55,24.4 74.55,23.75 75.3,23 R146.2@75.3,22.2 R148.2@76.9,22.2
NetQ8_1: Q8.1 R172.1 | length 1.8
  L6 w0.25: Q8.1@43.55,70.95 44.4,70.95 44.65,71.2 R172.1@45.2,71.2
NetR24_1: R24.1 U14.4 | length 1.6
  L1 w0.3: R24.1@97.5,32.4 97.6,32.4 98.15,31.85 U14.4@98.85,31.85
NetR111_1: R111.1 U17.7 | length 1.9
  L6 w0.25: U17.7@38.9,76.665 40,76.665 40.235,76.9 R111.1@40.7,76.9
NetR114_1: R114.1 R115.1 U18.7 | length 3.1
  L1 w0.25: R114.1@105.5,50.6 R115.1@105.5,52 105.525,51.975 U18.7@107.2,51.975
NetR126_1: R126.1 U22.24 | length 1.9
  L6 w0.23: U22.24@119,77.65 119.75,77.65
  L6 w0.4: 119.75,77.65 119.95,77.65 120.1,77.8 R126.1@120.8,77.8
NetR127_2: R127.2 U22.17 | length 1.9
  L6 w0.23: U22.17@119,81.15 119.35,81.15 119.7,81.5 119.975,81.5
  L6 w0.4: 119.975,81.5 R127.2@120.8,81.5
NetR131_1: R131.1 U22.31 | length 2
  L6 w0.23: 115.15,75.95 115.15,76.1 115.175,76.125 ; 115.2,76.1 115.35,76.25 U22.31@115.35,77
  L6 w0.4: R131.1@114.5,75.4 115.1,76
NetR132_2: R132.2 U22.12 | length 3.3
  L6 w0.23: U22.12@116.35,81.8 116.35,82.25
  L6 w0.25: 116.35,82.25 116.35,82.95
  L6 w0.4: 116.35,82.95 116.35,83.55 117.4,84.6 R132.2@117.4,84.7
NetR133_1: R133.1 R139.2 U22.2 | length 5.5
  L6 w0.23: 113.46,77.7 113.91,78.15 U22.2@114.2,78.15
  L6 w0.25: R139.2@111.2,74.3 R133.1@111.2,75.8 111.56,75.8 113.46,77.7
NetR185_1: R185.1 R186.2 U2.16 | length 4.4
  L6 w0.35: U2.16@19.1,20.725 20.175,20.725 20.4,20.5
  L6 w0.4: R185.1@19.4,19.1 R186.2@20.8,19.1 20.8,20.1 20.4,20.5
NON_REM1: R83.2 U13.22 | length 3
  L1 w0.25: U13.22@69,73.6 69.8,73.6 70.15,73.25 70.15,72.7 70.8,72.05 R83.2@70.8,71.8
ON_5V_LDO: R136.1 U22.4 | length 5.2
  L6 w0.23: 112.9,78.665 112.915,78.665 113.4,79.15 U22.4@114.2,79.15
  L6 w0.25: R136.1@110,77.4 110,77.907 110.758,78.665 112.9,78.665
ON_OFF: J1.6 Q7.3 R143.2 | length 181
  L1 w0.25: J1.6@87.79,56.25 v1(88.96,56.25)
  L3 w0.2: v1(21.8,39.8) 23.5,38.1 23.5,32.9 22.9,32.3 22.9,30.5 22.4,30 22.4,27.993 26.4,23.993 26.4,21.3 24.7,19.6 20.2,19.6 17.4,16.8 17.4,10.9 18.95,9.35 21.55,9.35 22.4,8.5 v1(23.4,8.5) ; v1(21.8,70.4) 22.35,70.95 23.25,70.95 23.7,71.4 23.7,72.9 25.5,74.7 27.6,74.7 28.6,75.7 29.4,75.7 30.9,77.2 39,77.2 39.8,76.4 42.4,76.4 43.05,75.75 v1(45.85,75.75) 62.65,75.75 64,74.4 64,74 64.6,73.4 64.907,73.4 66.407,71.9 67,71.9 67.8,71.1 68.307,71.1 68.7,70.707 68.7,70 68.4,69.7 68.4,67.2 68.8,66.8 v1(68.8,65.9)
  L6 w0.25: v1(21.8,39.8) 21.7,39.8 16.8,44.7 16,44.7 15.1,45.6 15.1,55.5 21.8,62.2 v1(21.8,70.4) ; v1(23.4,8.5) 26.9,8.5 27.9,7.5 R143.2@28.5,7.5 ; Q7.3@44.9,75.75 v1(45.85,75.75) ; v1(68.8,65.9) 68.8,63.493 69.093,63.2 69.9,63.2 71.9,61.2 71.9,57.1 77.9,51.1 83.8,51.1 85.475,52.775 86.775,52.775 88.96,54.96 v1(88.96,56.25)
ON_OFF_Q: Q9.1 R113.2 R173.2 | length 6.7
  L6 w0.25: R173.2@35.6,70.8 R113.2@37.2,70.8 37.6,70.8 38.775,69.625 40.225,69.625 40.55,69.95 Q9.1@40.55,70.95 Q9.1@40.55,71.05
ON_OFFN: Q7.1 Q8.3 Q9.3 R171.1 | length 9.3
  L6 w0.25: R171.1@37.3,73.5 38.6,73.5 39.25,72.85 39.7,72.85 Q9.3@39.9,72.85 Q8.3@42.9,72.85 45.15,72.85 45.55,73.25 Q7.1@45.55,73.85
OSCI_CLK32K: U17.1 Y3.1 | length 2.4
  L6 w0.25: Y3.1@30.9,75.375 30.92,75.395 U17.1@33.3,75.395
OSCO_CLK32K: U17.2 Y3.2 | length 2.5
  L6 w0.25: Y3.2@30.9,76.825 31.06,76.665 U17.2@33.3,76.665
P_ENABKL_5V: J19.3 R51.1 U8.4 | length 22.8
  L1 w0.25: U8.4@120.05,55.25 120.75,55.25 121.6,56.1 R51.1@121.8,56.1 121.8,57.3 121.4,57.7 121.4,61.9 121.8,62.3 121.8,63.5 122.35,64.05 122.35,64.95 124.1,66.7 126.4,66.7 128.2,68.5 128.2,70.76 J19.3@126.96,72
PCIE_CON_CLK1_N: J3.A14 R1.2 | length 76.8
  L1 w0.25: R1.2@46.3,65.6 45.925,65.975 45.925,67.406 46.169,67.65 46.95,67.65 47.2,67.4 47.2,67.15 47.475,66.875 47.825,66.875 48.1,67.15 v1(48.1,67.65)
  L3 w0.2: J3.A14@9.25,82.65 9.55,82.95 10.688,82.95 11.3,82.338 11.3,82.038 10.775,81.513 10.775,81.113 11.075,80.813 11.475,80.813 12,81.338 12.3,81.338 12.7,80.938 12.7,77.2 10.6,75.1 10.6,71.25 11,70.85 11,61.81 12.91,59.9 20,59.9 27.5,67.4 29.6,67.4 34.6,72.4 39.31,72.4 40.3,71.41 41.4,71.41 45.185,67.625 48.05,67.625 v1@48.075,67.65
PCIE_CON_CLK1_P: J3.A13 R3.2 | length 76.8
  L1 w0.25: R3.2@44.9,65.6 45.275,65.975 45.275,67.675 45.9,68.3 v1(48.1,68.3)
  L3 w0.2: J3.A13@7.25,83.65 10.978,83.65 13.4,81.228 13.4,76.91 11.3,74.81 11.3,71.54 11.7,71.14 11.7,62.1 13.2,60.6 19.71,60.6 27.21,68.1 29.31,68.1 34.31,73.1 39.6,73.1 40.59,72.11 41.69,72.11 45.475,68.325 48.075,68.325 v1(48.1,68.3)
PCIE_CON_RX_N: J3.A17 R5.2 | length 68.8
  L1 w0.25: R5.2@43.1,65.6 42.625,66.075 42.625,66.925 42.875,67.175 43.325,67.175 43.5,67 43.5,66.775 43.675,66.6 44.125,66.6 44.3,66.775 v1(44.3,67.1)
  L3 w0.2: J3.A17@7.25,79.65 6.9,79.3 6.9,78.65 7.15,78.4 7.5,78.4 7.75,78.15 7.75,77.25 8.15,76.85 8.15,67.586 7.6,67.036 7.6,63.7 8.15,63.15 8.15,60.714 11.214,57.65 21.086,57.65 27.786,64.35 30.814,64.35 33.877,67.414 33.877,68.241 35.936,70.3 37.792,70.3 38.292,69.8 39.364,69.8 41.989,67.175 44.225,67.175 v1(44.3,67.1)
PCIE_CON_RX_P: J3.A16 R8.2 | length 68.8
  L1 w0.25: R8.2@41.7,65.6 42.175,66.075 42.175,67.111 42.689,67.625 44.047,67.625 44.122,67.7 v1(44.3,67.7)
  L3 w0.2: J3.A16@9.25,80.65 9.25,80.306 8.2,79.256 8.2,77.436 8.6,77.036 8.6,67.4 8.05,66.85 8.05,63.886 8.6,63.336 8.6,60.9 11.4,58.1 20.9,58.1 27.6,64.8 30.627,64.8 33.427,67.6 33.427,68.427 35.75,70.75 37.978,70.75 38.478,70.25 39.55,70.25 42.175,67.625 44.225,67.625 v1(44.3,67.7)
PCIE_CON_TX_N: J3.B15 R10.2 | length 68.8
  L1 w0.25: v1(39.5,66.4) 39.5,66 R10.2@39.9,65.6
  L3 w0.2: J3.B15@4.75,81.65 4.7,81.7 2.4,81.7 1.65,80.95 1.65,78.186 4.75,75.086 4.75,72.85 4,72.1 4,60.8 8.3,56.5 22.164,56.5 28.664,63 32.764,63 37.339,67.575 38.836,67.575 39.425,66.986 39.425,66.475 v1(39.5,66.4)
PCIE_CON_TX_P: J3.B14 R14.2 | length 68.8
  L1 w0.25: R14.2@38.5,65.6 38.9,66 v1(38.9,66.4)
  L3 w0.2: J3.B14@2.75,82.65 2.2,82.65 1.864,82.314 1.864,81.8 1.2,81.136 1.2,78 4.3,74.9 4.3,73.036 3.55,72.286 3.55,60.614 8.114,56.05 22.35,56.05 28.85,62.55 32.95,62.55 36.4,66 36.7,66 36.85,65.85 37.15,65.85 37.35,66.05 37.35,66.35 37.2,66.5 37.2,66.8 37.525,67.125 38.65,67.125 38.975,66.8 38.975,66.475 v1(38.9,66.4)
PCIE_HPDETN: J3.B17 R15.1 U19.10 | length 163.7
  L1 w0.24: U19.10@66.65,23.95 67.2,23.95
  L1 w0.25: 67.2,23.95 67.8,23.95 v1(68.3,24.45) 68.55,24.7 R15.1@69.1,24.7
  L3 w0.2: v1(17.2,20.2) 15.9,18.9 15.9,10.4 18.3,8 22.007,8 22.307,7.7 27.3,7.7 28.8,6.2 31.1,6.2 32.1,7.2 38.1,7.2 39.2,6.1 41,6.1 42.2,7.3 51.1,7.3 52.8,9 60.9,9 62.9,11 76.6,11 78,12.4 78,16.1 75.15,18.95 74.243,18.95 68.743,24.45 v1(68.3,24.45)
  L6 w0.25: J3.B17@4.75,79.65 4.2,79.1 4.2,42.5 9.4,37.3 11.8,37.3 12.4,36.7 12.4,32 13.2,31.2 13.2,28.3 16,25.5 16,21.4 v1(17.2,20.2)
PCIE_RST: J3.A11 R13.1 | length 6.8
  L6 w0.25: J3.A11@7.25,87.65 7.75,87.65 10.3,85.1 10.3,84 R13.1@11.4,82.9
PCIE_RX_N: J2.52 R5.1 R7.1 | length 18.5
  L1 w0.25: v1(42.4,64.3) 42.8,64.3 R5.1@43.1,64.6 ; v1(56.25,67.7) 56.3,67.75 J2.52@57.39,67.75
  L6 w0.25: v1(42.4,64.3) 42.578,64.3 42.653,64.375 43.175,64.375 48.05,69.25 50.65,69.25 52.125,67.775 55.997,67.775 56.072,67.7 v1(56.25,67.7)
PCIE_RX_P: J2.54 R8.1 R9.1 | length 18.5
  L1 w0.25: R8.1@41.7,64.6 42,64.9 v1(42.4,64.9) ; v1(56.25,68.3) 56.3,68.25 J2.54@57.39,68.25
  L6 w0.25: v1(42.4,64.9) 42.578,64.9 42.653,64.825 42.989,64.825 47.864,69.7 50.836,69.7 52.311,68.225 55.997,68.225 56.072,68.3 v1(56.25,68.3)
PCIE_TX_N: J2.51 R10.1 R12.1 | length 18.5
  L1 w0.25: v1(39.2,64.3) 39.6,64.3 R10.1@39.9,64.6 ; v1(45.5,69.4) 45.678,69.4 45.753,69.475 47.925,69.475 49.625,67.775 50.3,67.775 50.325,67.75 J2.51@51.21,67.75
  L6 w0.25: v1(39.2,64.3) 39.378,64.3 39.453,64.375 40.911,64.375 41.5,64.964 41.5,66.036 40.6,66.936 40.6,67.5 41,67.9 42.6,67.9 44.175,69.475 45.247,69.475 45.322,69.4 v1(45.5,69.4)
PCIE_TX_P: J2.53 R14.1 R16.1 | length 18.5
  L1 w0.25: R14.1@38.5,64.6 38.8,64.9 v1(39.2,64.9) ; v1(45.5,70) 45.678,70 45.753,69.925 48.111,69.925 49.811,68.225 50.3,68.225 50.325,68.25 J2.53@51.21,68.25
  L6 w0.25: v1(39.2,64.9) 39.378,64.9 39.453,64.825 40.725,64.825 41.05,65.15 41.05,65.85 40.15,66.75 40.15,67.686 40.814,68.35 42.414,68.35 43.989,69.925 45.247,69.925 45.322,70 v1(45.5,70)
PCIE_WAKE: J2.39 J3.B11 J4.1 R151.1 | length 181.1
  L1 w0.25: v1(20.1,30.9) 24.8,26.2 24.8,25.558 27.058,23.3 33.2,23.3 33.8,22.7 41.6,22.7 43.1,24.2 44.6,24.2 v1(45.8,25.4) ; v1(47.9,64.4) 48.25,64.75 J2.39@51.21,64.75
  L3 w0.2: J3.B11@4.75,87.65 5.725,88.625 7.654,88.625 10.879,85.4 16.9,85.4 18.3,84 24.1,84 26,85.9 32.8,85.9 35.6,83.1 46.7,83.1 v1(47.7,82.1) ; v1(47.9,64.4) 47.9,66.3 48.9,67.3 48.9,71.2 v1(47.9,72.2)
  L6 w0.25: J3.B11@4.75,87.65 3.775,86.675 3.775,83.246 4.346,82.675 7.625,82.675 8.675,81.625 10.475,81.625 12.7,79.4 12.7,75.3 13.4,74.6 16.8,74.6 17.4,74 17.4,64.2 16.6,63.4 15.6,63.4 11.6,59.4 11.6,43 14.4,40.2 17.5,40.2 19,38.7 19,32 v1(20.1,30.9) ; v1(45.8,25.4) J4.1@45.8,26.9 ; v1(47.7,82.1) 48.3,82.1 49.8,80.6 49.8,76.4 47,73.6 R151.1@47,72.2 v1(47.9,72.2)
PHASE1_5V: C186.1 L8.2 Q2.5 Q2.6 Q2.7 U22.16 | length 18.7
  L3 w0.6: v1(104.3,83.4) 107.6,83.4 108.865,82.135 112.735,82.135 113.475,82.875 115.675,82.875 116.3,83.5 118.2,83.5 118.7,83 v1(118.7,82.7)
  L6 w0.23: U22.16@118.35,81.8 118.35,82.35 v1@118.6,82.6
  L6 w0.4: v1@118.6,82.6 v1(118.7,82.7) 119.8,83.8 C186.1@119.9,83.8
PHASE2_3V3: C187.2 L9.1 Q3.5 Q3.6 Q3.7 U22.25 | length 21.6
  L3 w0.6: v1(104.3,76.2) 105.1,75.4 109.589,75.4 111.514,73.475 112.875,73.475 114.2,74.8 114.2,76 115.6,77.4 118,77.4 118.6,76.8 v1(118.6,75.9)
  L6 w0.23: U22.25@118.35,77 118.35,76.15 v1(118.6,75.9)
  L6 w0.4: v1(118.6,75.9) 119.1,75.4 C187.2@119.9,75.4
PLLFILT: C105.1 U13.34 | length 1.6
  L1 w0.28: U13.34@65.2,76.9 v1(65.2,77.7)
  L6 w0.4: v1(65.2,77.7) 65.2,77.2 C105.1@65.4,77
POK_1V5: R152.1 R153.1 U1.3 U3.5 | length 59.3
  L1 w0.25: U1.3@54.2,34.025 54.2,32.6 53.4,31.8 R153.1@53.4,30.5 R152.1@55,30.5 55.4,30.5 58.3,27.6 63.942,27.6 65.942,29.6 70.4,29.6 72.8,27.2 81.9,27.2 84.1,29.4 84.1,31.2 89.3,36.4 91.1,36.4 92.1,37.4 92.1,42.25 93.3,43.45 94.3,43.45 94.6,43.15 U3.5@94.6,42.725
POK_3V3: R138.1 R184.1 U1.5 | length 100.9
  L1 w0.25: R184.1@51.8,30.5 v1(52.6,30.5) ; U1.5@55.2,33.725 55.2,33.4 v1(55.5,33.1) ; v1@101.3,52.2 101.3,60.5 107.3,66.5 112.7,66.5 v1(114.8,68.6)
  L3 w0.2: v1(52.6,30.5) 52.9,30.5 v1(55.5,33.1) ; v1@78.8,30.8 78.8,32.8 79.1,33.1 79.1,37.1 80.1,38.1 80.1,38.407 80.5,38.807 80.5,46.1 81.7,47.3 81.7,48.9 83.993,51.193 87.193,51.193 89,53 100.4,53 v1(101.3,52.1)
  L6 w0.25: v1(52.6,30.5) 53.3,31.2 54.8,31.2 56.4,29.6 59.6,29.6 60.2,30.2 78.4,30.2 v1(78.8,30.6) ; R138.1@113.8,69.6 113.8,69.1 114.3,68.6 v1(114.8,68.6)
POK_3V3_R: R135.1 R138.2 U22.28 | length 7.9
  L6 w0.23: 116.85,76.5 U22.28@116.85,77
  L6 w0.25: R138.2@113.8,70.6 113.8,71.9 R135.1@114.7,72.8 115.1,72.8 115.3,73 115.3,74.6 116.85,76.15 116.85,76.5
POK_5V: R137.1 U22.27 | length 7.2
  L6 w0.23: 117.35,76.475 U22.27@117.35,77
  L6 w0.25: R137.1@115.3,70.6 115.3,72.1 115.9,72.7 115.9,74.4 117.35,75.85 117.35,76.475
POK_5V_R: R134.1 R137.2 U22.13 | length 35.8
  L1 w0.25: v1(114.8,67.4) 118.9,67.4 120.4,68.9 120.4,79.593 120.7,79.893 120.7,85 v1(121,85.3) ; v1@114.85,67.45 v1@114.9,67.4
  L6 w0.23: U22.13@116.85,81.8 116.85,82.25
  L6 w0.25: R134.1@112.3,69.9 112.8,69.9 113,69.7 113,68.6 114.2,67.4 v1(114.8,67.4) 115.3,67.9 R137.2@115.3,69.6 ; 116.85,82.25 116.85,82.95 119.2,85.3 v1(121,85.3)
POKN: Q4.1 R117.1 R153.2 R184.2 U3.3 U21.1 | length 72.5
  L1 w0.25: R184.2@51.8,29.5 R153.2@53.4,29.5 53.4,29 54.5,27.9 56.35,27.9 57.25,27 64.108,27 66.008,28.9 70,28.9 72.7,26.2 75.3,26.2 76.45,25.05 Q4.1@77.45,25.05 78.15,25.05 79.1,26 82.3,26 85.55,29.25 85.55,30.85 v1(89.1,34.4) ; v1(88.6,37.8) 89.715,37.8 90.615,38.7 90.615,45.785 89.15,47.25 U21.1@89.15,47.95 93.15,47.95 95.2,45.9 95.507,45.9 96.1,45.307 96.1,43.8 95.6,43.3 U3.3@95.6,42.725
  L6 w0.25: v1(88.6,37.8) 89.1,37.3 v1(89.1,34.4)
PWR_BTN_HDR: J33.3 R142.2 SW2.2 | length 59.8
  L1 w0.25: v1(32.5,8.4) 39.6,8.4 40.2,9 41.2,9 42.7,10.5 45.4,10.5 46.6,11.7 46.6,13.9 48.64,15.94 54.76,15.94 59.2,11.5 60.4,11.5 61.8,10.1 73.9,10.1 75.46,8.54 J33.3@75.46,6
  L6 w0.25: SW2.2@32.25,2.755 31.5,3.505 R142.2@31.5,7.5 32.2,7.5 32.5,7.8 v1(32.5,8.4)
PWR_LED_GRN: D18.3 R145.1 | length 96.6
  L1 w0.25: D18.3@13,7.54 14.86,7.54 15.4,7 28.234,7 29.034,6.2 30.8,6.2 31.4,6.8 40,6.8 40.65,7.45 41.943,7.45 43.693,9.2 46.4,9.2 48.2,11 48.2,12.4 49.46,13.66 54.34,13.66 56.8,11.2 56.8,7.263 61.949,2.115 76.015,2.115 76.733,2.833 76.733,4.167 77.266,4.7 78.8,4.7 79.7,5.6 79.7,18.4 78.5,19.6 R145.1@78.5,21.2
PWR_LED_HDR: J33.2 R144.1 | length 19.9
  L1 w0.25: J33.2@78,3.46 79.06,3.46 80.9,5.3 80.9,18.9 80.1,19.7 R144.1@80.1,21.2
RBIAS: R81.1 U13.35 | length 4.1
  L1 w0.25: 64.1,77.75 64.45,77.75 64.7,77.5 U13.35@64.7,76.9
  L1 w0.4: R81.1@61.4,78.1 61.75,77.75 64.1,77.75
REFIN2_3V3: R129.1 U22.32 | length 5.6
  L6 w0.23: 114.4,76.3 114.6,76.3 114.85,76.55 U22.32@114.85,77
  L6 w0.4: R129.1@112.3,72.8 112.3,73.013 113.5,74.213 113.5,75.8 114,76.3 114.4,76.3
RESETN: C98.1 R77.1 R170.1 U13.26 | length 6.6
  L1 w0.25: U13.26@69,75.6 70.2,75.6 70.8,76.2 C98.1@70.8,76.5 70.8,76.9 71.1,77.2 71.4,77.2 71.8,77.6 R77.1@71.8,78 71.8,78.4 71.4,78.8 71.1,78.8 70.8,79.1 R170.1@70.8,79.6
RS232_CTS_CON: FB20.1 J30.8 | length 15.8
  L6 w0.25: FB20.1@23.35,97.9 23.35,98.35 23,98.7 20.8,98.7 19.2,100.3 19.2,103.7 21,105.5 22.932,105.5 J30.8@24.714,103.718
RS232_CTS_L: C165.5 FB20.8 U16.1 | length 13.9
  L3 w0.2: v1(23.35,96.3) 23.35,94.75 24.1,94 27.2,94 27.3,94.1 30.9,94.1 v1(31.1,94.3)
  L6 w0.25: C165.5@23.35,95.275 v1(23.35,96.3) FB20.8@23.35,96.9 ; v1(31.1,94.3) 32.5,94.3 32.95,93.85 U16.1@32.95,93.35
RS232_DCD_CON: FB20.4 J30.1 | length 8.3
  L6 w0.25: FB20.4@24.85,97.9 24.85,98.35 25.2,98.7 29.474,98.7 J30.1@31.656,100.882
RS232_DCD_L: C165.8 FB20.5 U16.4 | length 14
  L3 w0.2: v1(24.85,95.875) 26.475,97.5 30.2,97.5 v1(31.6,96.1)
  L6 w0.25: C165.8@24.85,95.275 v1(24.85,95.875) FB20.5@24.85,96.9 ; v1(31.6,96.1) 33.1,96.1 34.45,94.75 34.45,93.8
RS232_DSR_CON: FB21.1 J30.6 | length 4.6
  L6 w0.25: J30.6@30.259,103.718 31.782,103.718 33.65,101.85 FB21.1@33.65,101.4
RS232_DSR_L: C164.5 FB21.8 U16.5 | length 8.6
  L3 w0.2: v1(33.65,99.375) 33.2,98.925 33.2,96.8 v1(34,96)
  L6 w0.25: C164.5@33.65,98.775 v1(33.65,99.375) FB21.8@33.65,100.4 ; v1(34,96) 34.95,95.05 U16.5@34.95,93.35
RS232_DTR_CON: FB21.4 J30.4 | length 19
  L6 w0.25: J30.4@23.338,100.882 23.338,102.038 23.6,102.3 25.3,102.3 26.1,103.1 26.1,104.8 27.75,106.45 31.959,106.45 35.15,103.259 FB21.4@35.15,101.4
RS232_DTR_L: C164.8 FB21.5 U16.8 | length 9.2
  L3 w0.2: v1(35.15,99.8) 37.1,97.85 37.1,94.7 v1(36.55,94.15) ; v1@36.45,94.15 v1@36.5,94.2
  L6 w0.25: C164.8@35.15,98.775 v1(35.15,99.8) FB21.5@35.15,100.4 ; U16.8@36.45,93.35 36.45,94.05 v1(36.55,94.15)
RS232_RI_CON: FB20.2 J30.9 | length 7
  L6 w0.25: J30.9@21.941,103.718 21.941,100.159 22.8,99.3 23.5,99.3 23.85,98.95 FB20.2@23.85,97.9
RS232_RI_L: C165.6 FB20.7 U16.2 | length 13.5
  L3 w0.2: v1(23.85,95.875) 23.85,94.95 24.2,94.6 26.8,94.6 27.1,94.9 v1(31.6,94.9)
  L6 w0.25: C165.6@23.85,95.275 v1(23.85,95.875) FB20.7@23.85,96.9 ; v1(31.6,94.9) 32.7,94.9 33.45,94.15 U16.2@33.45,93.35
RS232_RTS_CON: FB21.3 J30.7 | length 11.3
  L6 w0.25: J30.7@27.486,103.718 27.486,104.786 28.5,105.8 31.7,105.8 34.65,102.85 FB21.3@34.65,101.4
RS232_RTS_L: C164.7 FB21.6 U16.7 | length 8.9
  L3 w0.2: v1(34.65,99.375) 34.4,99.125 34.4,96.6 34.6,96.4 34.6,95.2 35.15,94.65 v1(35.95,94.65)
  L6 w0.25: C164.7@34.65,98.775 v1(34.65,99.375) FB21.6@34.65,100.4 ; U16.7@35.95,93.35 v1(35.95,94.65)
RS232_RXD_CON: FB20.3 J30.2 | length 6.4
  L6 w0.25: FB20.3@24.35,97.9 24.35,98.95 24.7,99.3 27.302,99.3 J30.2@28.883,100.882
RS232_RXD_L: C165.7 FB20.6 U16.3 | length 14
  L3 w0.2: v1(24.35,96.3) 24.35,95.65 24.8,95.2 26.1,95.2 26.7,95.8 30.8,95.8 v1(31.1,95.5)
  L6 w0.25: C165.7@24.35,95.275 v1(24.35,96.3) FB20.6@24.35,96.9 ; v1(31.1,95.5) 32.9,95.5 33.95,94.45 U16.3@33.95,93.35
RS232_TXD_CON: FB21.2 J30.3 | length 13.4
  L6 w0.25: J30.3@26.111,100.882 26.111,102.011 26.4,102.3 28.1,102.3 28.9,103.1 28.9,104.6 29.4,105.1 31.4,105.1 34.15,102.35 FB21.2@34.15,101.4
RS232_TXD_L: C164.6 FB21.7 U16.6 | length 11.8
  L3 w0.2: v1(34.15,99.8) 33.95,100 33.3,100 31.9,98.6 31.9,96.8 34.55,94.15 v1(35.45,94.15)
  L6 w0.25: C164.6@34.15,98.775 v1(34.15,99.8) FB21.7@34.15,100.4 ; U16.6@35.45,93.35 v1(35.45,94.15)
RST_BTN_HDR: J33.5 R140.1 R141.2 SW1.2 | length 71.7
  L1 w0.25: v1(18.6,7.5) 19.1,8 28.3,8 28.7,7.6 39.834,7.6 40.5,8.266 41.566,8.266 43.1,9.8 45.7,9.8 47.4,11.5 47.4,13.607 48.973,15.18 54.62,15.18 60.7,9.1 71.8,9.1 72.92,7.98 J33.5@72.92,6
  L6 w0.25: v1(18.6,7.5) R140.1@19.4,7.5 R141.2@21,7.5 21,4.005 SW1.2@22.25,2.755
RST_BTNN: C198.1 R141.1 U24.1 | length 21.4
  L6 w0.25: R141.1@21,8.5 C198.1@22.5,8.5 24.25,10.25 26.35,10.25 27.5,11.4 27.5,15.8 29.7,18 29.7,19.4 30.35,20.05 32.1,20.05 32.75,20.7 U24.1@32.75,21.85
RTC_INTN: R112.1 R113.1 U17.3 | length 12.4
  L1 w0.25: v1(35.1,77.7) 35.1,76.9 37.2,74.8 37.2,72.6 v1(36.4,71.8)
  L6 w0.25: R112.1@30.9,78.5 32,78.5 32.565,77.935 U17.3@33.3,77.935 34.865,77.935 v1(35.1,77.7) ; v1(36.4,71.8) R113.1@37.2,71.8
SATA_CFAST_CDI: J15.PC1 R44.1 U19.13 | length 36
  L1 w0.24: U19.13@65.95,25.65 66.1,25.65
  L1 w0.25: 66.1,25.65 66.6,25.65 66.9,25.95 67.8,25.95 v1(68.3,25.45) ; v1(80.8,29.6) 82.4,29.6 83.2,30.4 83.2,31.9 88.5,37.2 v1(91.1,37.2)
  L6 w0.25: v1(68.3,25.45) 68.8,24.95 71.85,24.95 73,26.1 73,28.1 73.8,28.9 80.1,28.9 v1(80.8,29.6) ; R44.1@90.1,37.2 R44.1@90.005,37.205 ; R44.1@90.1,37.205 R44.1@90.005,37.205 ; J15.PC1@93,37.205 R44.1@90.005,37.205
SATA_CFAST_CDO: J15.PC17 R45.2 | length 3.3
  L6 w0.25: R45.2@90,56.9 90.625,57.525 J15.PC17@93,57.525
SATA_CFAST_RX_N: J15.S5 R37.2 | length 38.3
  L6 w0.25: R37.2@64.1,46.1 64.475,46.475 67.794,46.475 68.16,46.84 72.36,46.84 75.2,44 77.9,44 78.9,43 81.981,43 86.25,38.731 86.25,34.246 89.031,31.465 91.29,31.465 91.6,31.155 J15.S5@93,31.155
SATA_CFAST_RX_P: J15.S6 R39.2 | length 38.3
  L6 w0.25: R39.2@64.1,47.5 64.475,47.125 67.525,47.125 67.89,47.49 72.629,47.49 75.469,44.65 78.169,44.65 79.169,43.65 82.25,43.65 86.9,39 86.9,34.515 89.3,32.115 91.29,32.115 91.6,32.425 J15.S6@93,32.425
SATA_CFAST_TX_N: J15.S3 R41.2 | length 39
  L6 w0.25: R41.2@64.1,44.5 64.475,44.125 71.975,44.125 74.225,41.875 77.244,41.875 78.269,40.85 81.019,40.85 84.2,37.669 84.2,32.1 86.8,29.5 89.5,29.5 90.695,28.305 91.29,28.305 91.6,28.615 J15.S3@93,28.615
SATA_CFAST_TX_P: J15.S2 R43.2 | length 39
  L6 w0.25: R43.2@64.1,43.1 64.475,43.475 71.706,43.475 73.956,41.225 76.975,41.225 78,40.2 80.75,40.2 83.55,37.4 83.55,31.831 86.531,28.85 89.231,28.85 90.426,27.655 91.29,27.655 91.6,27.345 J15.S2@93,27.345
SATA_CON_RX_N: J14.5 R36.2 | length 63.2
  L1 w0.25: J14.5@15.3,33.92 15.61,33.61 16.591,33.61 24.031,41.05 30.7,41.05 31.3,40.45 32.35,40.45 34.9,37.9 46.3,37.9 48.6,40.2 49.281,40.2 50.781,41.7 60.4,41.7 61.5,42.8 61.5,43.3 61.3,43.5 60.425,43.5 60.125,43.8 60.125,44.2 60.425,44.5 61.3,44.5 61.5,44.7 61.5,45.281 60.54,46.24 60.406,46.375 60.306,46.475 v1(59.2,46.475)
  L6 w0.25: v1(59.2,46.475) 61.725,46.475 R36.2@62.1,46.1
SATA_CON_RX_P: J14.6 R38.2 | length 63.2
  L1 w0.25: J14.6@15.3,32.65 15.61,32.96 16.86,32.96 24.3,40.4 30.431,40.4 31.031,39.8 32.081,39.8 34.631,37.25 46.569,37.25 48.869,39.55 49.55,39.55 51.05,41.05 60.669,41.05 62.15,42.531 62.15,45.55 60.81,46.89 60.675,47.025 60.575,47.125 v1(59.2,47.125)
  L6 w0.25: v1(59.2,47.125) 61.725,47.125 R38.2@62.1,47.5
SATA_CON_TX_N: J14.3 R40.2 | length 59
  L1 w0.25: J14.3@15.3,36.46 15.61,36.77 17.089,36.77 18.6,38.281 18.6,39.181 23.069,43.65 31.231,43.65 32.881,42 36.5,42 37.44,42.94 44.04,42.94 44.931,42.05 48.15,42.05 52.2,46.1 54.3,46.1 54.5,45.9 54.5,45.025 54.8,44.725 55.2,44.725 55.5,45.025 55.5,45.9 55.7,46.1 56.6,46.1 57.25,45.45 57.25,44.569 56.806,44.125 v1(56.3,44.125)
  L6 w0.25: v1(56.3,44.125) 61.725,44.125 R40.2@62.1,44.5
SATA_CON_TX_P: J14.2 R42.2 | length 59
  L1 w0.25: J14.2@15.3,37.73 15.61,37.42 16.82,37.42 17.95,38.55 17.95,39.45 22.8,44.3 31.5,44.3 33.15,42.65 36.231,42.65 37.171,43.59 44.31,43.59 45.2,42.7 47.881,42.7 51.931,46.75 56.869,46.75 57.9,45.719 57.9,44.3 57.075,43.475 v1(56.3,43.475)
  L6 w0.25: v1(56.3,43.475) 61.725,43.475 R42.2@62.1,43.1